# Altium PCB PCB-Powermodule-v7.0.3.PcbDoc (part 1 of 3)
Units mil, origin at the board's own origin, x right, y up, seen from the top; angles counter-clockwise.
Board outline 3937.01 x 1771.65 mil, 2 copper layers (Top Layer, Bottom Layer), stack 61.811 mil thick; 138 components, 96 nets, 573 pads, 259 vias.
Unrouted connection lines stored in the file: 20.
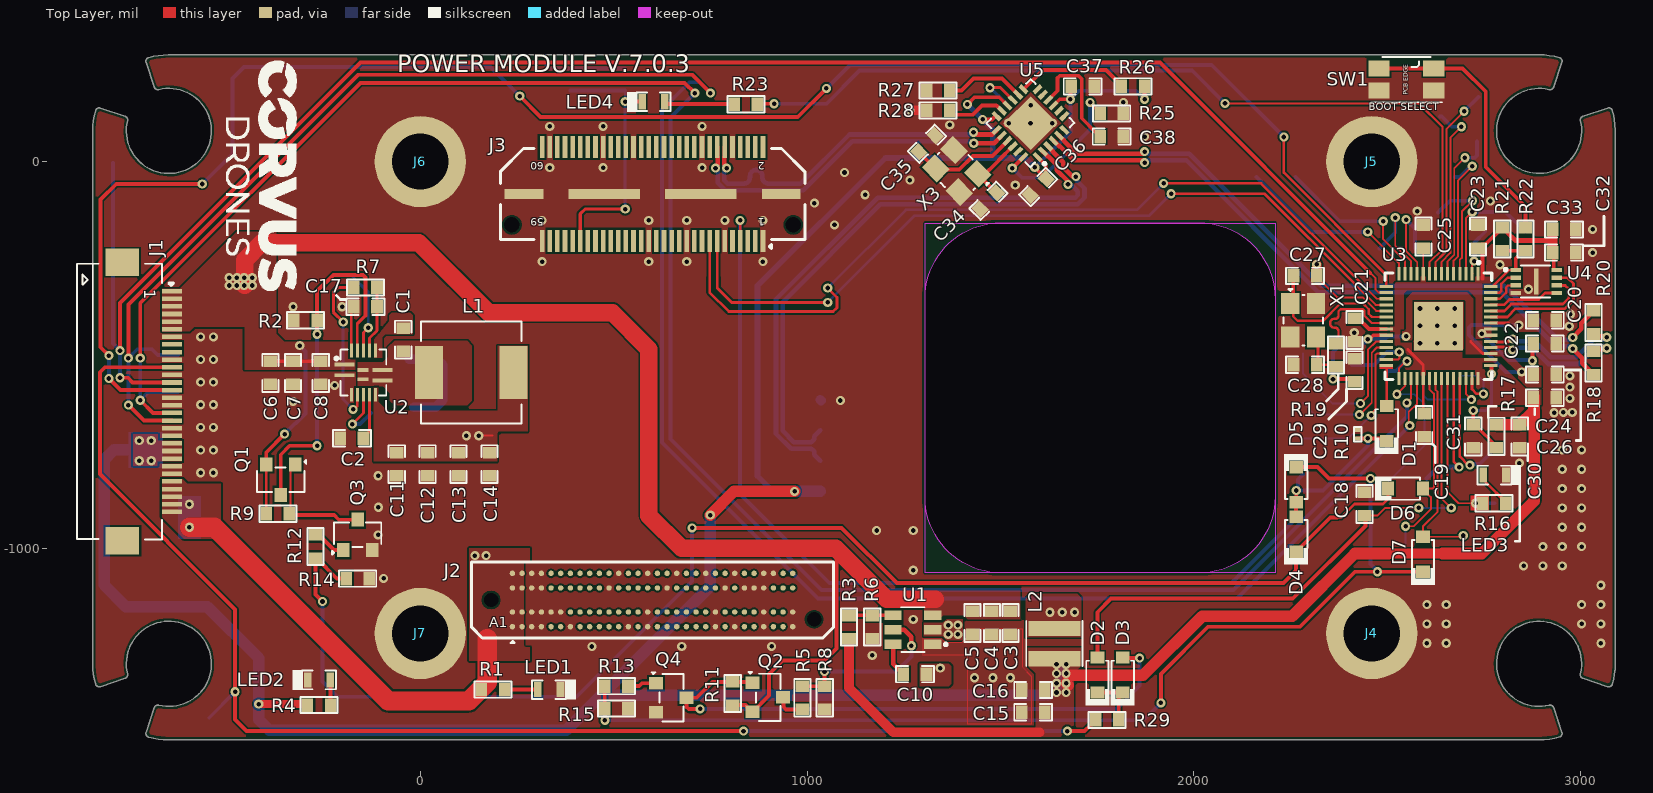
[diagram p0: Top Layer view]
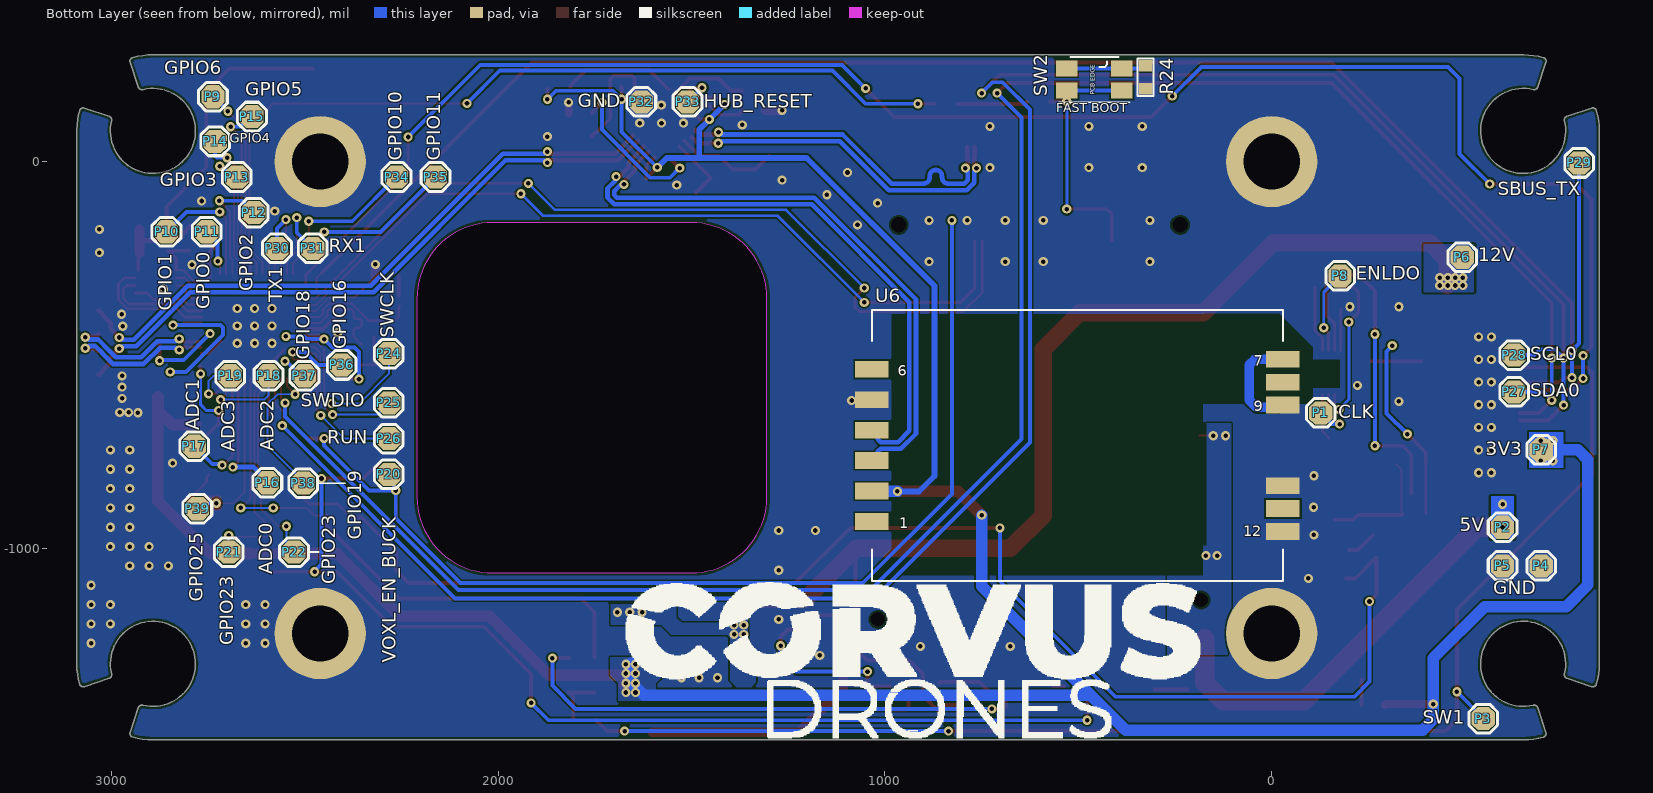
[diagram p1: Bottom Layer view, seen from below]
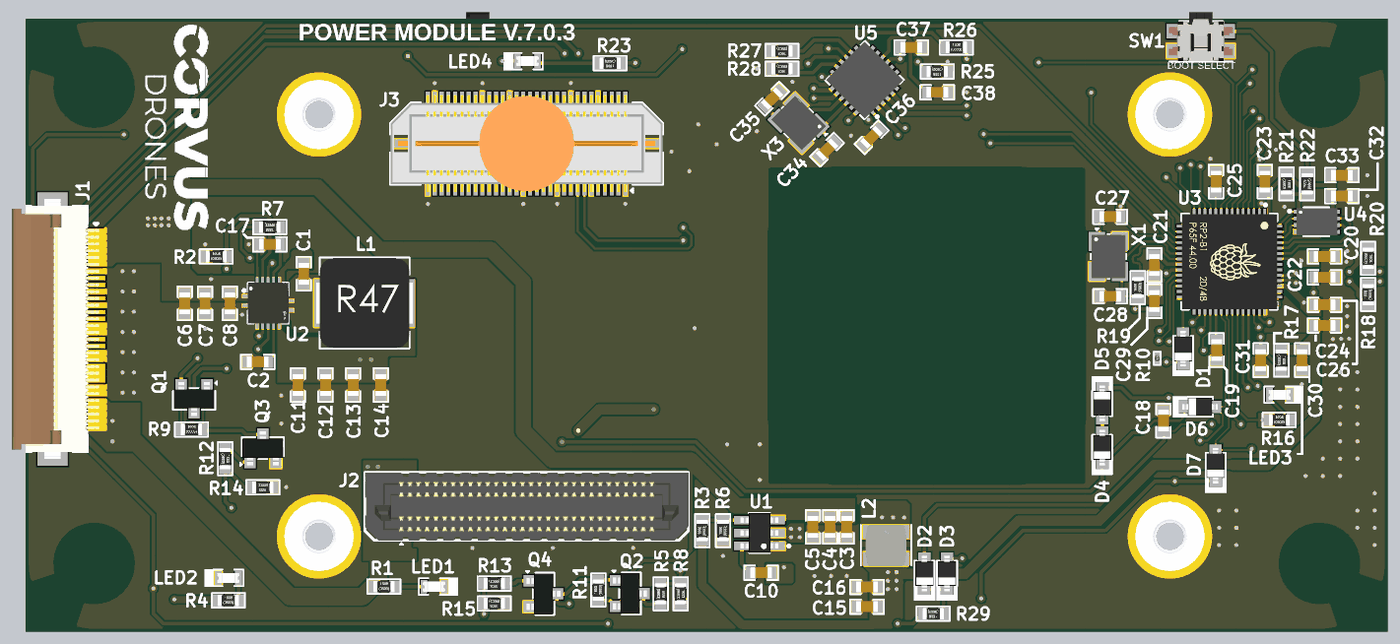
[diagram p3: 3D render of the assembled board from above, using the file's embedded part models]
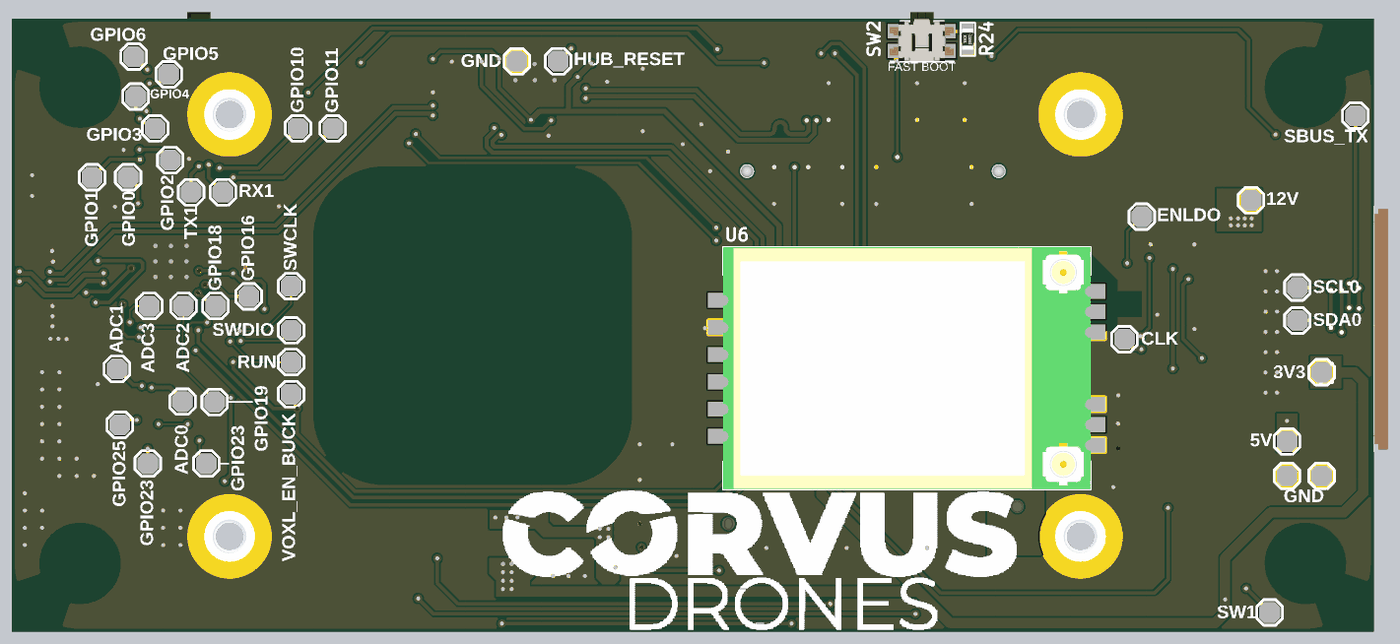
[diagram p4: 3D render of the assembled board from below, using the file's embedded part models]

## Layer stack, top to bottom
Top Solder: solder mask 0.3937, Solder Resist, Dk 3.5
Top Layer: signal copper 1.378
Dielectric 1: dielectric 59.0551, FR-4, Dk 4.8
Bottom Layer: signal copper 1.378
Bottom Solder: solder mask 0.3937, Solder Resist, Dk 3.5

## Board outline
-827.53,-1357.78 cw(c-830.64,-1348.44) -840.13,-1351.05 cw(c-650.38,-1298.77) -847.2,-1298.76 -847.2,79.19 cw(c-650.34,79.21) -840.13,131.49 cw(c-830.64,128.87) -827.53,138.21 -763.66,116.94 cw(c-766.78,107.61) -757.22,105.27 ccw(c-650.35,79.19) -549.41,35.46 -545.98,44.43 ccw(c-650.34,79.19) -676.42,186.06 cw(c-678.76,195.63) -688.1,192.51 -709.37,256.37 cw(c-700.03,259.48) -702.64,268.97 cw(c-650.33,79.2) -652.14,276.04 2892.96,276.04 cw(c2892.96,79.21) 2945.67,268.85 cw(c2942.63,259.48) 2951.96,256.32 2930.7,192.49 cw(c2921.37,195.61) 2919.28,186 2918.49,186.19 ccw(c2892.95,79.19) 2858.19,-25.17 2867.42,-27.8 ccw(c2892.96,79.19) 2999.82,105.29 cw(c3009.38,107.6) 3006.27,116.94 3070.13,138.21 cw(c3073.25,128.87) 3082.79,131.29 cw(c2892.94,79.2) 3089.06,96.32 3089.81,79.19 3089.81,-1298.76 cw(c2892.96,-1298.74) 3082.5,-1351.89 3082.47,-1351.88 cw(c3073.24,-1348.44) 3070.13,-1357.78 3006.27,-1336.51 cw(c3009.39,-1327.17) 2999.82,-1324.83 ccw(c2892.96,-1298.75) 2792.02,-1255.03 2788.59,-1263.99 ccw(c2892.96,-1298.76) 2919.03,-1405.63 cw(c2921.37,-1415.19) 2930.71,-1412.07 2951.98,-1475.94 cw(c2942.64,-1479.05) 2946.82,-1487.96 2946.88,-1488.08 cw(c2892.95,-1298.76) 2892.96,-1495.61 -650.35,-1495.61 -652.14,-1495.6 cw(c-650.37,-1298.76) -702.64,-1488.54 cw(c-700.03,-1479.05) -709.37,-1475.94 -688.1,-1412.07 cw(c-678.76,-1415.19) -676.42,-1405.63 ccw(c-650.35,-1298.76) -545.98,-1263.99 -549.41,-1255.03 ccw(c-650.35,-1298.75) -757.22,-1324.83 cw(c-766.78,-1327.17) -763.66,-1336.51
cut-out: 1305.04,-866.89 1305.04,-354.78 cw(c1501.89,-354.78) 1501.89,-157.93 2013.71,-157.93 cw(c2013.71,-354.78) 2210.56,-354.78 2210.56,-866.89 cw(c2013.71,-866.89) 2013.71,-1063.74 1501.89,-1063.74 cw(c1501.89,-866.89)

## Design rules (kind name [scope] priority, off if disabled: settings)
BoardOutlineClearance [All] p1: gap=0 ignorepadtopadclearanceinfootprint=FALSE except(7.87: Poly-OutlineEdge Poly-CavityEdge Poly-CutoutEdge Poly-SplitBarrior)
Clearance [All] p1: gap=5 ignorepadtopadclearanceinfootprint=FALSE
DiffPairsRouting [All] p1: maxlimit=5 minlimit=5 mostfreqgap=5 toplayer_minwidth=8 toplayer_maxwidth=12 toplayer_prefwidth=8 bottomlayer_minwidth=8 bottomlayer_maxwidth=12 bottomlayer_prefwidth=8 maxuncoupledlength=500
HoleSize [All] p1: absolutevalues=TRUE maxlimit=1000 minlimit=1 maxpercent=80.000 minpercent=20.000
HoleToHoleClearance [All] p1: gap=6 allowstackedmicrovias=TRUE
MatchedLengths "Schematic Matched Net Lengths_3" [InNetClass('USB_D')] p1: tolerance=20 checknetsindiffpair=TRUE checkdiffpairvsdiffpair=FALSE checkxsignals=FALSE checkothers=FALSE
MatchedLengths "Schematic Matched Net Lengths_2" [InNetClass('VOXL_USB')] p2: tolerance=20 checknetsindiffpair=TRUE checkdiffpairvsdiffpair=FALSE checkxsignals=FALSE checkothers=FALSE
MatchedLengths "Schematic Matched Net Lengths_1" [InNetClass('USB-WIFI')] p3: tolerance=20 checknetsindiffpair=TRUE checkdiffpairvsdiffpair=FALSE checkxsignals=FALSE checkothers=FALSE
MatchedLengths "Schematic Matched Net Lengths" [InNetClass('D')] p4: tolerance=20 checknetsindiffpair=TRUE checkdiffpairvsdiffpair=FALSE checkxsignals=FALSE checkothers=FALSE
MaxMinImpedance "Schematic Impedance Constraint_3" [InNetClass('D')] p1: minimum=88.00 maximum=102.0
MaxMinImpedance "Schematic Impedance Constraint_2" [InNetClass('USB-WIFI')] p2: minimum=88.00 maximum=102.0
MaxMinImpedance "Schematic Impedance Constraint_1" [InNetClass('USB_D')] p3: minimum=88.00 maximum=102.0
MaxMinImpedance "Schematic Impedance Constraint" [InNetClass('VOXL_USB')] p4: minimum=88.00 maximum=102.0
MinimumSolderMaskSliver [All] p1: minsoldermaskwidth=0
PolygonConnect [All] p1: connectstyle=Direct reliefconductorwidth=10 reliefentries=4 polygonreliefangle="90 Angle" airgapwidth=10
RoutingVias [All] p1: holewidth=11.81 width=23.62 viastyle="Through Hole" minholewidth=11.81 minwidth=23.62 maxholewidth=11.81 maxwidth=23.62
SilkToSilkClearance [All] p1: silktosilkclearance=0
SilkToSolderMaskClearance [IsPad] p1: minsilkscreentomaskgap=0 clearancetoexposedcopper=TRUE
SolderMaskExpansion SolderMaskExpansion_1 [IsVia] p1: expansion=4 istentingtop=TRUE
SolderMaskExpansion [All] p2: expansion=4 istentingtop=FALSE
UnRoutedNet [All] p1: checkbadconnections=TRUE
Width [All] p1: maxlimit=100 minlimit=5 preferedwidth=5
23 further rules are at their usual default settings.

## Classes and differential pairs
differential pair class VOXL_USB_Lines: VOXL_USB
differential pair class USB_WIFI_Lines: USB-WIFI
differential pair class USB_D_Lines: USB_D
differential pair class D_Lines: D
net class VOXL_USB: VOXL_USB_N VOXL_USB_P
net class USB_D: USB_D_N USB_D_P
net class USB-WIFI: USB-WIFI_N USB-WIFI_P
net class D: D_N D_P
component class U_WiFiModule_Section: C34 C35 C36 C37 C38 P30 P31 P32 P33 R25 R26 R27 R28 U5 U6 X3
component class U_Power_Section: C1 C2 C3 C4 C5 C6 C7 C8 C10 C11 C12 C13 C14 C15 C16 C17 C18 D1 D2 D3 D4 D5 D6 D7 L1 L2 LED1 LED2 P1 P2 P3 P4 P5 P6 P7 P8 P20 P21 P22 Q1 Q2 Q3 Q4 R1 R2 R3 R4 R5 R6 R7 R8 R9 R10 R11 R12 R13 R14 R15 R29 U1 U2
component class U_FlashMemory_Section: C32 C33 R21 R22 SW1 U4
component class U_Controller_Section: C19 C20 C21 C22 C23 C24 C25 C26 C27 C28 C29 C30 C31 LED3 P9 P10 P11 P12 P13 P14 P15 P16 P17 P18 P19 P24 P25 P26 P34 P35 P36 P37 P38 P39 R16 R17 R18 R19 R20 U3 X1
component class U_Connector_Section: J1 J2 J3 J4 J5 J6 J7 LED4 P27 P28 P29 R23 R24 SW2
differential pair VOXL_USB: +VOXL_USB_P -VOXL_USB_N
differential pair USB_D: +USB_D_P -USB_D_N
differential pair USB-WIFI: +USB-WIFI_P -USB-WIFI_N
differential pair D: +D_P -D_N

## Components (designator, comment, footprint, x,y, rotation, side; value= is the part's Value field where it differs from the comment)
C1 "0.1uF" CAP-0603 -44.2,-460.61 r90 top locked
C2 "4.7UF" CAP-0603 -177.2,-715.61 r0 top locked
C3 "10uF" CAP-0603 1526,-1193 r90 top locked
C4 "10uF" CAP-0603 1478,-1193 r90 top locked
C5 "0.1uF" CAP-0603 1428,-1193 r90 top locked
C6 "10uF" CAP-0603 -388,-546.4 r90 top locked
C7 "10uF" CAP-0603 -329.44,-546.4 r90 top locked
C8 "0.1uF" CAP-0603 -257.71,-546.4 r90 top locked
C10 "0.1uF" CAP-0603 1278.8,-1325.61 r180 top locked
C11 "22uF" CAP-0603 -61.2,-782.61 r90 top locked
C12 "22uF" CAP-0603 18.8,-782.61 r90 top locked
C13 "22uF" CAP-0603 98.8,-782.61 r90 top locked
C14 "22uF" CAP-0603 178.8,-782.61 r90 top locked
C15 "22uF" CAP-0603 1584.8,-1424 r0 top locked
C16 "22uF" CAP-0603 1584.8,-1366.61 r0 top
C17 "2.2uF" CAP-0603 -142.2,-375.61 r0 top locked
C18 "0.1uF" CAP-0603 2441.8,-885.61 r270 top locked
C19 "0.1uF" CAP-0603 2595.8,-681.61 r270 top locked
C20 "0.1uF" CAP-0603 2907.8,-410.61 r180 top locked
C21 "0.1uF" CAP-0603 2415.8,-435.61 r270 top
C22 "0.1uF" CAP-0603 2907.8,-470.61 r180 top locked
C23 "0.1uF" CAP-0603 2735,-194 r270 top locked
C24 "0.1uF" CAP-0603 2907.8,-610.61 r0 top locked
C25 "0.1uF" CAP-0603 2594,-194 r270 top locked
C26 "0.1uF" CAP-0603 2907.8,-550.61 r180 top locked
C27 "10pF" CAP-0603 2287.8,-295.61 r0 top locked
C28 "10pF" CAP-0603 2287.8,-525.61 r180 top locked
C29 "2.2uF" CAP-0603 2415.8,-539.61 r270 top
C30 "2.2uF" CAP-0603 2842.8,-710.61 r90 top locked
C31 "2.2uF" CAP-0603 2722.8,-710.61 r90 top locked
C32 "2.2uF" CAP-0603 2957.8,-235.61 r180 top locked
C33 "0.1uF" CAP-0603 2957.8,-175.61 r180 top locked
C34 "10pF" CAP-0603 1468.8,-101.61 r45 top
C35 "10pF" CAP-0603 1310.06,46.17 r45 top
C36 "0.1uF" CAP-0603 1597.8,-65.61 r45 top locked
C37 "1uF" CAP-0603 1712.8,194.39 r180 top locked
C38 "1uF" CAP-0603 1787.8,64.39 r180 top locked
D1 "DNP" SOD-323 2498.8,-677.61 r90 top
D2 "1N4148WS" SOD-323 1751,-1327.96 r90 top locked
D3 "1N4148WS" SOD-323 1816,-1327.96 r90 top locked
D4 "1N4148WS" SOD-323 2264.8,-963.61 r90 top locked
D5 "1N4148WS" SOD-323 2264.8,-835.61 r270 top locked
D6 "1N4148WS" SOD-323 2547.8,-845.61 r0 top locked
D7 "1N4148WS" SOD-323 2592.8,-1015.61 r90 top locked
J1 "FH12-30S-0.5SH(55)" FH12-30S-0.5SH(55) -706.5,-620.59 r270 top locked
J2 "ADM6-30-01.5-L-4-2-A-TR" ADM6-30-01.5-L-4-2-A-TR 600.41,-1133.86 r180 top locked
J3 "QTH-030-01-L-D-A-K-TR" QTH-030-01-L-D-A-K-TR 600.4,-83.86 r180 top
J4 "9774050151R" SPACER 2460.63,-1220.47 r0 top
J5 "9774050151R" SPACER 2460.63,0 r0 top
J6 "9774050151R" SPACER 0,0 r0 top
J7 "9774050151R" SPACER 0,-1220.47 r0 top
L1 "1.5uH" HA72L-06301R5LFTR 131.81,-545.59 r0 top locked
L2 "3.3uH" VLS3012HBX-3R3M 1639.8,-1246.61 r270 top locked
LED1 "Emerald" LED-0603 332.8,-1365.61 r0 top locked
LED2 "Emerald" LED-0603 -262.2,-1340.61 r180 top locked
LED3 "Emerald" LED-0603 2777.8,-810.61 r0 top locked
LED4 "RED" LED-0603 602.8,154.39 r180 top locked
P1 "TEST POINT" TEST-POINT -127,-650 r180 bottom locked
P2 "TEST POINT" TEST-POINT -597.2,-945.61 r180 bottom locked
P3 "TEST POINT" TEST-POINT -547.2,-1440.61 r180 bottom locked
P4 "TEST POINT" TEST-POINT -697.2,-1045.61 r180 bottom locked
P5 "TEST POINT" TEST-POINT -597.2,-1045.61 r180 bottom locked
P6 "TEST POINT" TEST-POINT -493.2,-247.61 r180 bottom locked
P7 "TEST POINT" TEST-POINT -697.2,-745.61 r180 bottom locked
P8 "TEST POINT" TEST-POINT -177.2,-295.61 r180 bottom locked
P9 "TEST POINT" TEST-POINT 2737.8,167.39 r180 bottom locked
P10 "TEST POINT" TEST-POINT 2857.8,-181.61 r180 bottom locked
P11 "TEST POINT" TEST-POINT 2753.8,-181.61 r180 bottom locked
P12 "TEST POINT" TEST-POINT 2632,-132 r180 bottom locked
P13 "TEST POINT" TEST-POINT 2676,-40 r180 bottom locked
P14 "TEST POINT" TEST-POINT 2732,52 r180 bottom
P15 "TEST POINT" TEST-POINT 2636.8,116.39 r180 bottom locked
P16 "TEST POINT" TEST-POINT 2596.8,-830.61 r180 bottom
P17 "TEST POINT" TEST-POINT 2786,-736 r180 bottom locked
P18 "TEST POINT" TEST-POINT 2594,-554 r180 bottom locked
P19 "TEST POINT" TEST-POINT 2693,-554 r180 bottom locked
P20 "TEST POINT" Test-point 2282.8,-809 r180 bottom
P21 "TEST POINT" Test-point 2697,-1010 r180 bottom
P22 "TEST POINT" Test-point 2528,-1010 r180 bottom
P24 "TEST POINT" TEST-POINT 2282.8,-496.61 r180 bottom
P25 "TEST POINT" TEST-POINT 2282.8,-624.07 r180 bottom
P26 "TEST POINT" TEST-POINT 2282.8,-716.54 r180 bottom
P27 "TEST POINT" TEST-POINT -627.2,-595.61 r270 bottom locked
P28 "TEST POINT" TEST-POINT -627.2,-500.61 r270 bottom locked
P29 "TEST POINT" TEST-POINT -795.2,-3.61 r270 bottom locked
P30 "TEST POINT" TEST-POINT 2572,-224.61 r180 bottom
P31 "TEST POINT" TEST-POINT 2479.84,-224.61 r180 bottom
P32 "TEST POINT" TEST-POINT 1629.6,154.31 r180 bottom
P33 "TEST POINT" TEST-POINT 1510.39,154.31 r180 bottom
P34 "TEST POINT" TEST-POINT 2263,-40 r180 bottom
P35 "TEST POINT" TEST-POINT 2162.02,-40 r180 bottom
P36 "TEST POINT" TEST-POINT 2405,-526 r180 bottom locked
P37 "TEST POINT" TEST-POINT 2501,-554 r180 bottom locked
P38 "TEST POINT" TEST-POINT 2503.8,-831.61 r180 bottom
P39 "TEST POINT" TEST-POINT 2777.8,-897.61 r180 bottom
Q1 "SI2301CDS" SOT-23 -361.2,-822.61 r180 top locked
Q2 "SI2301CDS" SOT-23 898.8,-1385.61 r270 top locked
Q3 "2N7002,215" SOT-23 -162.2,-965.61 r0 top
Q4 "2N7002,215" SOT-23 648.8,-1386.61 r270 top
R1 "200R" RES-0603 187.8,-1365.61 r180 top locked
R2 "100K" RES-0603 -297.2,-410.61 r180 top locked
R3 "33.2K" RES-0603 1108.39,-1203.8 r270 top locked
R4 "200R" RES-0603 -262.2,-1405.61 r180 top locked
R5 "10K" RES-0603 987.8,-1386.61 r90 top locked value=10kR
R6 "10K" RES-0603 1168.39,-1203.8 r270 top locked value=10kR
R7 "100K" RES-0603 -142.2,-325.61 r0 top locked
R8 "100K" RES-0603 1045.8,-1386.61 r90 top locked
R9 "1M" RES-0603 -368.6,-911 r180 top locked
R10 "DNP" RES-0201 2423.84,-705.06 r270 top locked
R11 "1M" RES-0603 807.8,-1375.61 r270 top locked
R12 "4.7K" RES-0603 -271.2,-995.61 r90 top locked
R13 "4.7K" RES-0603 506.8,-1356.61 r0 top locked
R14 "100K" RES-0603 -162.2,-1078.61 r0 top locked
R15 "100K" RES-0603 506.8,-1414.61 r0 top locked
R16 "200R" RES-0603 2776.8,-883.61 r180 top locked
R17 "200R" RES-0603 2782.8,-710.61 r90 top locked
R18 "27R" RES-0603 3034,-521 r270 top locked
R19 "1K" RES-0603 2367.8,-500.61 r270 top
R20 "27R" RES-0603 3034,-416 r90 top locked
R21 "10K" RES-0603 2797.8,-200.61 r90 top locked value=10kR
R22 "1K" RES-0603 2857.8,-200.61 r270 top locked
R23 "200R" RES-0603 841.81,148.39 r0 top locked
R24 "DNP" RES-0603 326,218 r270 bottom locked
R25 "12K" RES-0603 1787.8,124.39 r0 top locked
R26 "50K" RES-0603 1842.8,194.39 r180 top locked value=50kR
R27 "50K" RES-0603 1338.88,183.74 r0 top value=50kR
R28 "50K" RES-0603 1338.78,132.43 r0 top value=50kR
R29 "1K" RES-0603 1776,-1444 r0 top
SW1 "EVQ-P7J01P" EVQ-P7J01P 2549.8,212.4 r180 top
SW2 "DNP" EVQ-P7J01P 458.8,212.4 r0 bottom
U1 "TPS563201DDCR" "SOT-23-6 THIN" 1273.8,-1210.61 r180 top locked
U2 "RT7291AGQUF" "QFN-16(3X3) RT7291AGQUF" -147.2,-545.59 r270 top locked
U3 "RP2040TR7" "QFN-56 (7X7)" 2632.8,-425.61 r270 top locked
U4 "W25Q16JVUXIQ TR" "8-USON (2X3)" 2832.62,-280.63 r0 top locked
U5 "USB2422/MJ" "24-QFN (4X4)" 1577.8,99.39 r135 top locked
U6 "BL-R8812AF1" BL-R8812AF1 502.35,-734 r180 bottom locked
X1 "12MHz" MCSJK-7U-12.00-10-10-80-B-10 2282.8,-410.61 r270 top
X3 "24MHz" MCSJK-7U-24.00-12-10-60-B-10 1386.8,-24.61 r135 top

## Footprints (in the part's own frame and the unit in brackets; to place one, negate y for a bottom-side part, rotate by r counter-clockwise, add the part's x,y. Pads: shape width x height; smd on the part's side, far side on the other; paste and mask are expansions set on the pad)
"8-USON (2X3)" [mm]
  rect 0.711x0.28 smd: 1(0,0) 2(0,-0.5) 3(0,-1) 4(0,-1.5) 5(2.695,-1.5) 6(2.695,-1) 7(2.695,-0.5) 8(2.695,0)
  rect 0.3x1.7 smd: 9(1.348,-0.75)
  silkscreen extent -0.72,-1.8 2.26,0.3, body extent -0.15,-1.75 2.85,0.25, height 0.6
"24-QFN (4X4)" [mm]
  rect 0.69x0.28 smd: 1(-1.895,1.25) 2(-1.895,0.75) 3(-1.895,0.25) 4(-1.895,-0.25) 5(-1.895,-0.75) 6(-1.895,-1.25) 13(1.895,-1.25) 14(1.895,-0.75) 15(1.895,-0.25) 16(1.895,0.25) 17(1.895,0.75) 18(1.895,1.25)
  rect 0.28x0.69 smd: 7(-1.25,-1.895) 8(-0.75,-1.895) 9(-0.25,-1.895) 10(0.25,-1.895) 11(0.75,-1.895) 12(1.25,-1.895) 19(1.25,1.895) 20(0.75,1.895) 21(0.25,1.895) 22(-0.25,1.895) 23(-0.75,1.895) 24(-1.25,1.895)
  rect 2.5x2.5 smd: 25(0,0)
  silkscreen extent -2.6,-2.06 2.04,2.06, body extent -2,-2 2,2, height 0.8
ADM6-30-01.5-L-4-2-A-TR [mm]
  round 0.356 smd: A01(9.207,1.75) A02(8.572,1.75) A03(7.938,1.75) A04(7.302,1.75) A05(6.667,1.75) A06(6.032,1.75) A07(5.397,1.75) A08(4.763,1.75) A09(4.127,1.75) A10(3.492,1.75) A11(2.857,1.75) A12(2.222,1.75) A13(1.587,1.75) A14(0.952,1.75) A15(0.317,1.75) A16(-0.318,1.75) A17(-0.953,1.75) A18(-1.588,1.75) A19(-2.223,1.75) A20(-2.858,1.75) A21(-3.492,1.75) A22(-4.127,1.75) A23(-4.763,1.75) A24(-5.397,1.75) A25(-6.032,1.75) A26(-6.667,1.75) A27(-7.302,1.75) A28(-7.938,1.75) A29(-8.572,1.75) A30(-9.207,1.75) B01(9.207,0.79) B02(8.572,0.79) B03(7.938,0.79) B04(7.302,0.79) B05(6.667,0.79) B06(6.032,0.79) B07(5.397,0.79) B08(4.763,0.79) B09(4.127,0.79) B10(3.492,0.79) B11(2.857,0.79) B12(2.222,0.79) B13(1.587,0.79) B14(0.952,0.79) B15(0.317,0.79) B16(-0.318,0.79) B17(-0.953,0.79) B18(-1.588,0.79) B19(-2.222,0.79) B20(-2.857,0.79) B21(-3.492,0.79) B22(-4.127,0.79) B23(-4.763,0.79) B24(-5.397,0.79) B25(-6.032,0.79) B26(-6.667,0.79) B27(-7.302,0.79) B28(-7.938,0.79) B29(-8.572,0.79) B30(-9.207,0.79) C01(9.207,-0.79) C02(8.572,-0.79) C03(7.938,-0.79) C04(7.302,-0.79) C05(6.667,-0.79) C06(6.032,-0.79) C07(5.397,-0.79) C08(4.763,-0.79) C09(4.127,-0.79) C10(3.492,-0.79) C11(2.857,-0.79) C12(2.222,-0.79) C13(1.588,-0.79) C14(0.953,-0.79) C15(0.318,-0.79) C16(-0.317,-0.79) C17(-0.952,-0.79) C18(-1.587,-0.79) C19(-2.222,-0.79) C20(-2.857,-0.79) C21(-3.492,-0.79) C22(-4.127,-0.79) C23(-4.763,-0.79) C24(-5.397,-0.79) C25(-6.032,-0.79) C26(-6.667,-0.79) C27(-7.302,-0.79) C28(-7.938,-0.79) C29(-8.572,-0.79) C30(-9.207,-0.79) D01(9.207,-1.75) D02(8.572,-1.75) D03(7.938,-1.75) D04(7.302,-1.75) D05(6.667,-1.75) D06(6.032,-1.75) D07(5.397,-1.75) D08(4.763,-1.75) D09(4.127,-1.75) D10(3.492,-1.75) D11(2.858,-1.75) D12(2.223,-1.75) D13(1.588,-1.75) D14(0.953,-1.75) D15(0.318,-1.75) D16(-0.317,-1.75) D17(-0.952,-1.75) D18(-1.587,-1.75) D19(-2.222,-1.75) D20(-2.857,-1.75) D21(-3.492,-1.75) D22(-4.127,-1.75) D23(-4.763,-1.75) D24(-5.397,-1.75) D25(-6.032,-1.75) D26(-6.667,-1.75) D27(-7.302,-1.75) D28(-7.938,-1.75) D29(-8.572,-1.75) D30(-9.207,-1.75)
  round 0 hole 0.95 unplated: ""(-10.61,1.27) ""(10.61,0)
  silkscreen extent -11.89,-2.5 11.89,2.82, body extent -11.89,-2.49 11.89,2.51, height 4.1
BL-R8812AF1 [mm]
  rect 2.2x1.1 smd: 1(-13.5,-5) 2(-13.5,-3) 3(-13.5,-1) 4(-13.5,1) 5(-13.5,3) 6(-13.5,5) 7(13.5,5.65) 8(13.5,4.15) 9(13.5,2.65) 10(13.5,-2.65) 11(13.5,-4.15) 12(13.5,-5.65)
  silkscreen extent -13.5,-8.9 13.5,8.9, body extent -13.5,-8.91 13.5,8.89, height 2.09
CAP-0603 [mil]
  rect 30x35 smd mask+2.36: 1(-30,0) 2(30,0)
  silkscreen extent -49,-21 49,21, body extent -32,-16 31,16, height 34
EVQ-P7J01P [mm]
  rect 1.4x1.05 smd: 1(-1.8,0.725) 1(1.8,0.725) 2(-1.8,-0.725) 2(1.8,-0.725)
  silkscreen extent -2.34,-1.47 2.31,1.5, body extent -2.35,-2.1 2.35,1.45, height 1.35
FH12-30S-0.5SH(55) [mm]
  rect 0.3x1.3 smd paste-2: 1(-7.25,1.625) 2(-6.75,1.625) 3(-6.25,1.625) 4(-5.75,1.625) 5(-5.25,1.625) 6(-4.75,1.625) 7(-4.25,1.625) 8(-3.75,1.625) 9(-3.25,1.625) 10(-2.75,1.625) 11(-2.25,1.625) 12(-1.75,1.625) 13(-1.25,1.625) 14(-0.75,1.625) 15(-0.25,1.625) 16(0.25,1.625) 17(0.75,1.625) 18(1.25,1.625) 19(1.75,1.625) 20(2.25,1.625) 21(2.75,1.625) 22(3.25,1.625) 23(3.75,1.625) 24(4.25,1.625) 25(4.75,1.625) 26(5.25,1.625) 27(5.75,1.625) 28(6.25,1.625) 29(6.75,1.625) 30(7.25,1.625)
  rect 1.8x2.2 smd: MP1(-9.15,-1.625) MP2(9.15,-1.625)
  silkscreen extent -9.05,-4.62 9.05,1.73, body extent -9.55,-4.62 9.55,1.78, height 2.09
HA72L-06301R5LFTR [mm]
  rect 1.85x3.5 smd: 1(-2.775,0) 2(2.775,0)
  silkscreen extent -3.3,-3.35 3.3,3.35, body extent -3.55,-3.3 3.55,3.3, height 3.01
LED-0603 [mm]
  rect 0.5x1 smd: 1(-0.75,0) 2(0.75,0)
  silkscreen extent -1.12,-0.66 1.75,0.66, body extent -0.82,-0.37 0.82,0.36, height 0.68
MCSJK-7U-12.00-10-10-80-B-10 [mm]
  rect 1.4x1.2 smd mask+0.07: 1(-1.1,-0.85) 2(1.1,-0.85) 3(1.1,0.85) 4(-1.1,0.85)
  silkscreen extent -2.06,-1.3 1.65,1.3, body extent -1.6,-1.25 1.6,1.25, height 0.91
MCSJK-7U-24.00-12-10-60-B-10 [mm]
  rect 1.4x1.2 smd mask+0.07: 1(-1.1,-0.85) 2(1.1,-0.85) 3(1.1,0.85) 4(-1.1,0.85)
  silkscreen extent -2.06,-1.3 1.65,1.3, body extent -1.6,-1.25 1.6,1.25, height 0.91
"QFN-16(3X3) RT7291AGQUF" [mm]
  rect 0.25x1.3 smd paste+0 mask+0.051: 1(-0.52,-1.25) 2(0.18,-1.25) 8(0.53,1.25) 9(-0.17,1.25)
  rect 0.9x0.2 smd paste+0 mask+0.051: 3(1.45,-0.8) 4(1.45,-0.4) 5(1.45,0) 6(1.45,0.4) 7(1.45,0.8) 10(-1.45,0.8) 11(-1.45,0.4) 12(-1.45,0) 13(-1.45,-0.4) 14(-1.45,-0.8)
  rect 0.25x0.7 smd paste+0 mask+0.051: 15(-0.16,-0.025) 16(0.44,-0.025)
  silkscreen extent -1.5,-1.83 1.5,1.5, body extent -1.51,-1.51 1.51,1.51, height 0.53
"QFN-56 (7X7)" [mm]
  rect 0.875x0.2 smd: 1(-3.438,2.6) 2(-3.438,2.2) 3(-3.438,1.8) 4(-3.438,1.4) 5(-3.438,1) 6(-3.438,0.6) 7(-3.438,0.2) 8(-3.438,-0.2) 9(-3.438,-0.6) 10(-3.438,-1) 11(-3.438,-1.4) 12(-3.438,-1.8) 13(-3.438,-2.2) 14(-3.438,-2.6) 29(3.438,-2.6) 30(3.438,-2.2) 31(3.438,-1.8) 32(3.438,-1.4) 33(3.438,-1) 34(3.438,-0.6) 35(3.438,-0.2) 36(3.438,0.2) 37(3.438,0.6) 38(3.438,1) 39(3.438,1.4) 40(3.438,1.8) 41(3.438,2.2) 42(3.438,2.6)
  rect 0.2x0.875 smd: 15(-2.6,-3.438) 16(-2.2,-3.438) 17(-1.8,-3.438) 18(-1.4,-3.438) 19(-1,-3.438) 20(-0.6,-3.438) 21(-0.2,-3.438) 22(0.2,-3.438) 23(0.6,-3.438) 24(1,-3.438) 25(1.4,-3.438) 26(1.8,-3.438) 27(2.2,-3.438) 28(2.6,-3.438) 43(2.6,3.438) 44(2.2,3.438) 45(1.8,3.438) 46(1.4,3.438) 47(1,3.438) 48(0.6,3.438) 49(0.2,3.438) 50(-0.2,3.438) 51(-0.6,3.438) 52(-1,3.438) 53(-1.4,3.438) 54(-1.8,3.438) 55(-2.2,3.438) 56(-2.6,3.438)
  rect 3.2x3.2 smd: 57(0,0)
  silkscreen extent -4.22,-3.5 3.5,3.5, body extent -3.5,-3.5 3.5,3.5, height 0.9
QTH-030-01-L-D-A-K-TR [mm]
  rect 0.305x1.45 smd: 01(-7.25,3.086) 02(-7.25,-3.086) 03(-6.75,3.086) 04(-6.75,-3.086) 05(-6.25,3.086) 06(-6.25,-3.086) 07(-5.75,3.086) 08(-5.75,-3.086) 09(-5.25,3.086) 10(-5.25,-3.086) 11(-4.75,3.086) 12(-4.75,-3.086) 13(-4.25,3.086) 14(-4.25,-3.086) 15(-3.75,3.086) 16(-3.75,-3.086) 17(-3.25,3.086) 18(-3.25,-3.086) 19(-2.75,3.086) 20(-2.75,-3.086) 21(-2.25,3.086) 22(-2.25,-3.086) 23(-1.75,3.086) 24(-1.75,-3.086) 25(-1.25,3.086) 26(-1.25,-3.086) 27(-0.75,3.086) 28(-0.75,-3.086) 29(-0.25,3.086) 30(-0.25,-3.086) 31(0.25,3.086) 32(0.25,-3.086) 33(0.75,3.086) 34(0.75,-3.086) 35(1.25,3.086) 36(1.25,-3.086) 37(1.75,3.086) 38(1.75,-3.086) 39(2.25,3.086) 40(2.25,-3.086) 41(2.75,3.086) 42(2.75,-3.086) 43(3.25,3.086) 44(3.25,-3.086) 45(3.75,3.086) 46(3.75,-3.086) 47(4.25,3.086) 48(4.25,-3.086) 49(4.75,3.086) 50(4.75,-3.086) 51(5.25,3.086) 52(5.25,-3.086) 53(5.75,3.086) 54(5.75,-3.086) 55(6.25,3.086) 56(6.25,-3.086) 57(6.75,3.086) 58(6.75,-3.086) 59(7.25,3.086) 60(7.25,-3.086)
  rect 2.54x0.64 smd: G1(-8.445,0) G4(8.445,0)
  rect 4.7x0.64 smd: G2(-3.175,0) G3(3.175,0)
  round 0 hole 1.02 unplated: ""(-9.24,2.03) ""(9.24,2.03)
  silkscreen extent -10,-2.99 10,3.58, body extent -10,-3.56 10,3.56, height 4.37
RES-0201 [mm]
  rect 0.27x0.37 smd mask+0.055: 1(-0.275,0) 2(0.275,0)
  silkscreen extent -0.48,-0.25 0.48,0.25, body extent -0.3,-0.15 0.3,0.15, height 0.29
RES-0603 [mil]
  rect 30x35 smd: 1(-30,0) 2(30,0)
  silkscreen extent -48,-21 48,21, body extent -31,-17 31,17, height 18
SOD-323 [mm]
  rect 0.8x0.9 smd mask+0.055: 1(-1.15,0) 2(1.15,0)
  silkscreen extent -2.01,-0.79 0.94,0.79, body extent -1.3,-0.67 1.3,0.67, height 1.1
SOT-23 [mm] "TRANS NPN 40V 0.6A SOT23"
  rect 0.82x0.92 smd: 1(-0.95,-1) 2(0.95,-1) 3(0,1)
  silkscreen extent -1.68,-1.3 1.55,0.81, body extent -1.5,-1.25 1.5,1.25, height 1.05
"SOT-23-6 THIN" [mm]
  rect 1.12x0.62 smd: 1(-1.3,0.95) 2(-1.3,0) 3(-1.3,-0.95) 4(1.3,-0.95) 5(1.3,0) 6(1.3,0.95)
  silkscreen extent -2.22,-1.47 0.79,1.47, body extent -1.4,-1.45 1.4,1.45, height 1.44
SPACER [mm]
  round 6 hole 3.7: 1(0,0)
  body extent -2.55,-2.55 2.55,2.55, height 5.2
TEST-POINT [mil]
  oct 60x60 smd: 1(0,0)
  silkscreen extent -37,-37 37,37
Test-point [mil]
  oct 60x60 smd: 1(0,0)
  silkscreen extent -37,-37 37,37
VLS3012HBX-3R3M [mm]
  rect 1x3.4 smd: 1(-1,0) 2(1,0)
  silkscreen extent -1.5,-1.85 1.47,1.85, body extent -1.51,-1.51 1.51,1.51, height 1.32

## Part data
C1 C5 C8 C10 C18 C19 C20 C21 C22 C23 C24 C25 C26 C33 C36: library part CL10B104KB8NNNC, "CAP CER 0.1UF 50V X7R 0603", Capacitance=100nF, Case Code (Imperial)=0603, Case Code (Metric)=1608, Dielectric=X7R, LCSC Part Number=C1591, MANUFACTURER=Samsung, Max Operating Temperature=125°C, Min Operating Temperature=-55°C, Package Quantity=1, Supplier Part Number 1=1276-1000-1-ND, Tolerance=10%, Voltage=50V, Case/Package=0603, Category="Ceramic Capacitors", ComponentLink1Description=https://datasheet.ciiva.com/25803/cl10b104kb8nnnc-25803393.pdf?src-supplier=Digi-Key, ComponentLink1URL=https://datasheet.ciiva.com/25803/cl10b104kb8nnnc-25803393.pdf?src-supplier=Digi-Key, ComponentLink2Description=https://datasheet.ciiva.com/26838/getdatasheetpartid-89097-26838411.pdf?src-supplier=Verical, ComponentLink2URL=https://datasheet.ciiva.com/26838/getdatasheetpartid-89097-26838411.pdf?src-supplier=Verical, ComponentLink3Description=https://datasheet.ciiva.com/29198/456651-da-01-en-vs-kondensator-0605-29198839.pdf?src-supplier=Conrad, ComponentLink3URL=https://datasheet.ciiva.com/29198/456651-da-01-en-vs-kondensator-0605-29198839.pdf?src-supplier=Conrad, Construction=Flat, Contact Plating=Tin, Depth=0.8mm, Height=0.8mm, Lead Free="Lead Free", Length=1.6mm, Manufacturer Part Number=CL10B104KB8NNNC, Material=Ceramic, Mount="Surface Mount", Packaging="Tape and Reel", Pricing 1="1=0.10000, 10=0.03000, 50=0.01640, 100=0.01340, 500=0.00954, 1000=0.00750 (USD)", Radiation Hardening=No, RoHS=Yes, RoHS Compliant=Yes, Series=CL, Stock 1=3998791, Supplier 1=Digi-Key, Thickness=0.035inch, Voltage Rating=50V, Voltage Rating (DC)=50V, Width=0.031inch
C2: library part CL10A475KA8NQNC, "CAP CER 4.7UF 25V X5R 0603", Capacitance=4.7uF, Case Code (Imperial)=0603, Case Code (Metric)=1608, Dielectric=X5R, LCSC Part Number=C69335, MANUFACTURER=Samsung, Max Operating Temperature=85°C, Min Operating Temperature=-55°C, Package Quantity=1, Supplier Part Number 1=1276-1900-1-ND, Tolerance=10%, Voltage Rating=25V, Case/Package=0603, ComponentLink1Description=http://www.samsungsem.com/kr/support/product-search/mlcc/CL10A475KA8NQNC.jsp?src-supplier=Digi-Key, ComponentLink1URL=http://www.samsungsem.com/kr/support/product-search/mlcc/CL10A475KA8NQNC.jsp?src-supplier=Digi-Key, Contact Plating=Tin, Depth=0.8mm, Lead Free="Lead Free", Length=1.6mm, Manufacturer Part Number=CL10A475KA8NQNC, Mount="Surface Mount", Packaging="Tape and Reel", Pricing 1="1=0.37, 10=0.255, 100=0.1528, 500=0.11456, 1000=0.09675 (USD)", Stock 1=2252340, Supplier 1=Digi-Key, Termination=Wraparound, Thickness=0.035inch, Width=0.031inch
C3 C4 C6 C7: library part GRM188R61E106KA73D, "CAP CER 10UF 25V X5R 0603", Case/Package=0603, LCSC Part Number=C344022, MANUFACTURER=Murata, Supplier Part Number 1=81-GRM188R61E106KA3D, Category="Ceramic Capacitors", ComponentLink1Description=https://search.murata.co.jp/Ceramy/image/img/A01X/G101/ENG/GRM188R61E106KA73-01.pdf?src-supplier=Digi-Key, ComponentLink1URL=https://search.murata.co.jp/Ceramy/image/img/A01X/G101/ENG/GRM188R61E106KA73-01.pdf?src-supplier=Digi-Key, Manufacturer Part Number=GRM188R61E106KA73D, Pricing 1="1=0.36000, 10=0.25800, 50=0.25800, 100=0.15500, 1000=0.09800, 10000=0.06900 (USD)", RoHS=Yes, RoHS Compliant=Yes, Stock 1=319428, Supplier 1=Mouser
C11 C12 C13 C14 C15 C16: library part CC0603MRX5R6BB226, "CAP CER 22UF 10V X5R 0603", Case Code (Imperial)=0603, Case Code (Metric)=1608, Dielectric=X5R, LCSC Part Number=C109447, MANUFACTURER=Yageo, Max Operating Temperature=85°C, Min Operating Temperature=-55°C, Package Quantity=4000, Supplier Part Number 1=311-1819-1-ND, Tolerance=20%, Voltage Rating=10V, Capacitance=22uF, Case/Package=0603, Category="Ceramic Capacitors", ComponentLink1Description=http://www.mouser.com/ds/2/447/Yageo_UPY-GP_NP0_16V-to-50V_9-358835.pdf?src-supplier=Mouser, ComponentLink1URL=http://www.mouser.com/ds/2/447/Yageo_UPY-GP_NP0_16V-to-50V_9-358835.pdf?src-supplier=Mouser, ComponentLink2Description=http://www.yageo.com/documents/recent/UPY-GPHC_X5R_4V-to-50V_25.pdf?src-supplier=Digi-Key, ComponentLink2URL=http://www.yageo.com/documents/recent/UPY-GPHC_X5R_4V-to-50V_25.pdf?src-supplier=Digi-Key, Halogen Free="Halogen Free", Height=0.8mm, Item Type=Capacitor, Lead Free="Lead Free", Length=0.063inch, Manufacturer Part Number=CC0603MRX5R6BB226, Mount="Surface Mount", Packaging="Tape and Reel", Pricing 1="1=0.68000, 10=0.48000, 50=0.36300, 100=0.31610, 500=0.23416, 1000=0.19903 (USD)", RoHS=Yes, RoHS Compliant=Yes, Stock 1=19628, Supplier 1=Digi-Key, Termination=SMD/SMT, Thickness=0.035inch, Voltage Rating (DC)=10V, Weight=7.1E-05oz, Width=0.8mm
C17 C29 C30 C31 C32: library part CC0603KRX5R8BB225, "CAP CER 2.2UF 25V X5R 0603", Case Code (Imperial)=0603, Case Code (Metric)=1608, Dielectric=X5R, LCSC Part Number=C309478, MANUFACTURER=Yageo, Max Operating Temperature=85°C, Min Operating Temperature=-55°C, Package Quantity=4000, Resistor Type=Ceramic, Supplier Part Number 1=311-1786-1-ND, Tolerance=10%, Voltage Rating=25V, Capacitance=2.2uF, Case/Package=0603, ComponentLink1Description=https://www.verical.com/server-webapp/html/getDatasheet?partID=782757&src-supplier=Verical, ComponentLink1URL=https://www.verical.com/server-webapp/html/getDatasheet?partID=782757&src-supplier=Verical, Depth=0.8mm, Halogen Free="Halogen Free", Item Type=Capacitor, Lead Free="Lead Free", Length=1.6mm, Manufacturer Part Number=CC0603KRX5R8BB225, Mount="Surface Mount", Packaging="Tape and Reel", Pricing 1="1=0.4, 10=0.276, 50=0.1932, 100=0.1656, 500=0.1242, 1000=0.10488 (USD)", Radiation Hardening=No, RoHS Compliant=Yes, Stock 1=687936, Supplier 1=Digi-Key, Termination=SMD/SMT, Thickness=0.037inch, Voltage Rating (DC)=25V, Weight=7.1E-05oz, Width=0.031inch
C27 C28 C34 C35: library part CC0603JRNPO9BN100, "CAP CER 10PF 50V C0G/NPO 0603", Case Code (Imperial)=0603, Case Code (Metric)=1608, Dielectric=C0G, Insulation Resistance=100GR, LCSC Part Number=C106245, MANUFACTURER=Yageo, Max Operating Temperature=125°C, Min Operating Temperature=-55°C, Package Quantity=1, Resistor Type=Ceramic, Supplier Part Number 1=311-1058-1-ND, Temperature Coefficient=30ppm/°C, Tolerance=5%, Voltage=50V, Capacitance=10pF, Case/Package=0603, Category="Ceramic Capacitors", ComponentLink1Description=https://datasheet.ciiva.com/25787/cl10a475ka8nqnc-25787017.pdf?src-supplier=Digi-Key, ComponentLink1URL=https://datasheet.ciiva.com/25787/cl10a475ka8nqnc-25787017.pdf?src-supplier=Digi-Key, ComponentLink2Description=https://datasheet.ciiva.com/144/mlccorderingcode-144651.pdf?src-supplier=Digi-Key, ComponentLink2URL=https://datasheet.ciiva.com/144/mlccorderingcode-144651.pdf?src-supplier=Digi-Key, ComponentLink3Description=https://datasheet.ciiva.com/11786/0900766b8079c870-11786407.pdf?src-supplier=RSComponents, ComponentLink3URL=https://datasheet.ciiva.com/11786/0900766b8079c870-11786407.pdf?src-supplier=RSComponents, ComponentLink4Description=https://datasheet.ciiva.com/5789/1734582-5789616.pdf?src-supplier=Farnell, ComponentLink4URL=https://datasheet.ciiva.com/5789/1734582-5789616.pdf?src-supplier=Farnell, ComponentLink5Description=https://datasheet.ciiva.com/26862/getdatasheetpartid-403524-26862758.pdf?src-supplier=Verical, ComponentLink5URL=https://datasheet.ciiva.com/26862/getdatasheetpartid-403524-26862758.pdf?src-supplier=Verical, ComponentLink6Description=https://datasheet.ciiva.com/7978/1132289-7978126.pdf?src-supplier=Element14, ComponentLink6URL=https://datasheet.ciiva.com/7978/1132289-7978126.pdf?src-supplier=Element14, ComponentLink7Description=https://datasheet.ciiva.com/46430/1835847-46430150.pdf?src-supplier=Element14, ComponentLink7URL=https://datasheet.ciiva.com/46430/1835847-46430150.pdf?src-supplier=Element14, ComponentLink8Description=https://datasheet.ciiva.com/144/mlccorderingcode-144650.pdf?src-supplier=Digi-Key, ComponentLink8URL=https://datasheet.ciiva.com/144/mlccorderingcode-144650.pdf?src-supplier=Digi-Key, ComponentLink9Description=https://datasheet.ciiva.com/144/mlccorderingcode-144649.pdf?src-supplier=Digi-Key, ComponentLink9URL=https://datasheet.ciiva.com/144/mlccorderingcode-144649.pdf?src-supplier=Digi-Key, ComponentLink10Description=https://datasheet.ciiva.com/5425/upy-gp-np0-16v-to-50v-8-5425564.pdf?src-supplier=Mouser, ComponentLink10URL=https://datasheet.ciiva.com/5425/upy-gp-np0-16v-to-50v-8-5425564.pdf?src-supplier=Mouser, ComponentLink11Description=https://datasheet.ciiva.com/8033/1734582-8033710.pdf?src-supplier=Element14, ComponentLink11URL=https://datasheet.ciiva.com/8033/1734582-8033710.pdf?src-supplier=Element14, ComponentLink12Description=https://datasheet.ciiva.com/8033/1734582-8033706.pdf?src-supplier=Element14, ComponentLink12URL=https://datasheet.ciiva.com/8033/1734582-8033706.pdf?src-supplier=Element14, Depth=0.8mm, Height=0.8mm, Lead Free="Lead Free", Length=1.6mm, Manufacturer Part Number=CC0603JRNPO9BN100, Mount="Surface Mount", Number of Pins=2, Packaging="Tape and Reel", Pricing 1="1=0.10000, 10=0.03900, 50=0.02120, 100=0.01740, 500=0.01240, 1000=0.00974 (USD)", Radiation Hardening=No, REACH SVHC="No SVHC", RoHS=Yes, RoHS Compliant=Yes, Series=CC, Stock 1=1700978, Supplier 1=Digi-Key, Termination=SMD/SMT, Thickness=0.035inch, Voltage Rating=50V, Voltage Rating (DC)=50V, Width=0.031inch
C37 C38: library part CC0603KRX5R8BB105, "CAP CER 1UF 25V X5R 0603", Case Code (Imperial)=0603, Case Code (Metric)=1608, Dielectric=X5R, LCSC Part Number=C14664, MANUFACTURER=Yageo, Max Operating Temperature=85°C, Min Operating Temperature=-55°C, Package Quantity=1, Supplier Part Number 1=311-1445-1-ND, Tolerance=10%, Voltage Rating=25V, Capacitance=1uF, Case/Package=0603, Category="Ceramic Capacitors", ComponentLink1Description=https://datasheet.ciiva.com/176/mlccorderingcode-176785.pdf?src-supplier=Digi-Key, ComponentLink1URL=https://datasheet.ciiva.com/176/mlccorderingcode-176785.pdf?src-supplier=Digi-Key, ComponentLink2Description=https://datasheet.ciiva.com/176/mlccorderingcode-176786.pdf?src-supplier=Digi-Key, ComponentLink2URL=https://datasheet.ciiva.com/176/mlccorderingcode-176786.pdf?src-supplier=Digi-Key, ComponentLink3Description=https://datasheet.ciiva.com/176/mlccorderingcode-176787.pdf?src-supplier=Digi-Key, ComponentLink3URL=https://datasheet.ciiva.com/176/mlccorderingcode-176787.pdf?src-supplier=Digi-Key, ComponentLink4Description=https://datasheet.ciiva.com/17436/upy-gphc-x5r-4v-to-50v-12-17436952.pdf?src-supplier=Avnet+Europe, ComponentLink4URL=https://datasheet.ciiva.com/17436/upy-gphc-x5r-4v-to-50v-12-17436952.pdf?src-supplier=Avnet+Europe, ComponentLink5Description=https://datasheet.ciiva.com/7978/1525783-7978171.pdf?src-supplier=Element14, ComponentLink5URL=https://datasheet.ciiva.com/7978/1525783-7978171.pdf?src-supplier=Element14, ComponentLink6Description=https://datasheet.ciiva.com/11586/upy-gphc-x5r-4v-to-50v-12-11586318.pdf?src-supplier=Avnet, ComponentLink6URL=https://datasheet.ciiva.com/11586/upy-gphc-x5r-4v-to-50v-12-11586318.pdf?src-supplier=Avnet, Construction=Flat, Depth=0.8mm, Halogen Free="Halogen Free", Height=0.8mm, Item Type=Capacitor, Lead Free="Lead Free", Length=1.6mm, Manufacturer Part Number=CC0603KRX5R8BB105, Mount="Surface Mount", Number of Pins=2, Packaging="Tape and Reel", Pricing 1="1=0.12000, 10=0.08400, 50=0.04760, 100=0.03940, 500=0.02764, 1000=0.02288 (USD)", Radiation Hardening=No, REACH SVHC="No SVHC", RoHS=Yes, RoHS Compliant=Yes, Series=CC, Stock 1=919939, Supplier 1=Digi-Key, Termination=SMD/SMT, Thickness=0.035inch, Voltage Rating (DC)=25V, Width=0.031inch
D1: library part 1N4148WS, "75V 200mW Single 1.25V@150mA 4ns 150mA SOD-323 Switching Diode ROHS", LCSC Part Number=C181133, MANUFACTURER="Guangdong Hottech", Package=SOD-323, Item Type=Diode, Manufacturer Part Number=1N4148WS
D2 D3 D4 D5 D6 D7: "75V 200mW Single 1.25V@150mA 4ns 150mA SOD-323 Switching Diode ROHS", LCSC Part Number=C181133, MANUFACTURER="Guangdong Hottech", Package=SOD-323, Item Type=Diode, Manufacturer Part Number=1N4148WS
J1: "CONN FFC BOTTOM 30POS 0.5MM R/A", Contact Voltage Rating (AC)=50V, LCSC Part Number=C506793, MANUFACTURER=Hirose, Supplier Part Number=6825061, Category="FFC / FPC", ComponentLink1Description=https://datasheet.ciiva.com/11745/0900766b80d985fc-11745247.pdf?src-supplier=Rs, ComponentLink1URL=https://datasheet.ciiva.com/11745/0900766b80d985fc-11745247.pdf?src-supplier=Rs, ComponentLink2Description=https://datasheet.ciiva.com/15176/getdatasheetpartid-439676-15176854.pdf?src-supplier=Verical, ComponentLink2URL=https://datasheet.ciiva.com/15176/getdatasheetpartid-439676-15176854.pdf?src-supplier=Verical, ComponentLink3Description=https://datasheet.ciiva.com/22630/58803-22630360.pdf?src-supplier=Farnell, ComponentLink3URL=https://datasheet.ciiva.com/22630/58803-22630360.pdf?src-supplier=Farnell, ComponentLink4Description=https://datasheet.ciiva.com/7661/58803-7661387.pdf?src-supplier=Element14, ComponentLink4URL=https://datasheet.ciiva.com/7661/58803-7661387.pdf?src-supplier=Element14, Connector Type=4640ConnectorType, Contact Pitch=500um, Item Type="FFC/FPC Connector", Manufacturer Part Number=FH12-30S-0.5SH(55), Pricing="2000=1.38 (USD)", RoHS=Yes, Stock=2000, Supplier="Future Electronics"
J2: "CONN 0.635MM HDR 30POS SMD", MANUFACTURER=Samtec, Supplier Part Number=2502799, Category=Connectors, ComponentLink1Description=http://suddendocs.samtec.com/catalog_english/adm6.pdf?src-supplier=Digi-Key, ComponentLink1URL=http://suddendocs.samtec.com/catalog_english/adm6.pdf?src-supplier=Digi-Key, ComponentLink2Description=https://datasheet.octopart.com/ADM6-30-01.5-L-4-2-A-TR-Samtec-datasheet-156965346.pdf?src-supplier=Sager+Electronics, ComponentLink2URL=https://datasheet.octopart.com/ADM6-30-01.5-L-4-2-A-TR-Samtec-datasheet-156965346.pdf?src-supplier=Sager+Electronics, ComponentLink3Description=https://datasheet.octopart.com/ADM6-30-01.5-L-4-2-A-TR-Samtec-datasheet-154586211.pdf?src-supplier=Toby+Electronics, ComponentLink3URL=https://datasheet.octopart.com/ADM6-30-01.5-L-4-2-A-TR-Samtec-datasheet-154586211.pdf?src-supplier=Toby+Electronics, ComponentLink4Description=https://datasheet.octopart.com/ADM6-30-01.5-L-4-2-A-TR-Samtec-datasheet-142027009.pdf?src-supplier=Master+Electronics, ComponentLink4URL=https://datasheet.octopart.com/ADM6-30-01.5-L-4-2-A-TR-Samtec-datasheet-142027009.pdf?src-supplier=Master+Electronics, Item Type=Connector, Manufacturer Part Number=ADM6-30-01.5-L-4-2-A-TR, Pricing="1=20.84 (GBP)", RoHS=No, Stock=10, Supplier=Rs
J3: "CONN HDR 60POS SMD GOLD", MANUFACTURER=Samtec, Supplier Part Number=1802786, Category=Connectors, ComponentLink1Description=https://datasheet.ciiva.com/9698/qth-9698170.pdf?src-supplier=Avnet, ComponentLink1URL=https://datasheet.ciiva.com/9698/qth-9698170.pdf?src-supplier=Avnet, ComponentLink2Description=https://datasheet.ciiva.com/400/qth-xxx-xx-x-d-xxx-mkt-400842.pdf?src-supplier=Digikey, ComponentLink2URL=https://datasheet.ciiva.com/400/qth-xxx-xx-x-d-xxx-mkt-400842.pdf?src-supplier=Digikey, Manufacturer Part Number=QTH-030-01-L-D-A-K-TR, Pricing="1=9.4, 25=8.99, 100=7.57, 250=6.25, 500=6.09 (GBP)", RoHS=Yes, Stock=69, Supplier=Rs
J4 J5 J6 J7: "Spacer Material: Steel Mounting: SMT Series: WA-SMSI Thread D: M2.5", MANUFACTURER="Wurth Electronics", Max Operating Temperature=150°C, Min Operating Temperature=-55°C, Supplier Part Number=732-7095-1-ND, Category="Spacers, Standoffs", ComponentLink1Description=http://www.farnell.com/datasheets/1960373.pdf?src-supplier=Farnell, ComponentLink1URL=http://www.farnell.com/datasheets/1960373.pdf?src-supplier=Farnell, ComponentLink2Description=http://www.mouser.com/ds/2/445/9774050151R-611428.pdf?src-supplier=Mouser, ComponentLink2URL=http://www.mouser.com/ds/2/445/9774050151R-611428.pdf?src-supplier=Mouser, ComponentLink3Description=https://media.digikey.com/pdf/Data%20Sheets/Wurth%20Electronics%20PDFs/WA-SMSx_Performance_Flyer.pdf?src-supplier=Digikey, ComponentLink3URL=https://media.digikey.com/pdf/Data%20Sheets/Wurth%20Electronics%20PDFs/WA-SMSx_Performance_Flyer.pdf?src-supplier=Digikey, ComponentLink4Description=http://www.farnell.com/datasheets/1960373.pdf?src-supplier=Element14, ComponentLink4URL=http://www.farnell.com/datasheets/1960373.pdf?src-supplier=Element14, ComponentLink5Description=https://datasheet.octopart.com/9774050151R-W%C3%BCrth-Elektronik-datasheet-48588545.pdf?src-supplier=Element14, ComponentLink5URL=https://datasheet.octopart.com/9774050151R-W%C3%BCrth-Elektronik-datasheet-48588545.pdf?src-supplier=Element14, ComponentLink6Description=http://www.farnell.com/datasheets/1960373.pdf?src-supplier=Newark, ComponentLink6URL=http://www.farnell.com/datasheets/1960373.pdf?src-supplier=Newark, ComponentLink7Description=https://katalog.we-online.de/em/datasheet/9774050151R.pdf?src-supplier=Digikey, ComponentLink7URL=https://katalog.we-online.de/em/datasheet/9774050151R.pdf?src-supplier=Digikey, Height=5.1mm, Item Type=Spacer, Length=0.252inch, Manufacturer Part Number=9774050151R, Material=Steel, Outside Diameter=0.201inch, Packaging=10Packaging, Plating=Tin, Pricing="1=1.16, 10=1.098, 50=0.979, 100=0.895 (USD)", Reach SVHC Compliant=Unknown, RoHS=Yes, Series=WA-SMSI, Stock=39400, Supplier=Digikey, Threaded/Unthreaded=Threaded
L1: library part HA72L-06301R5LFTR, "Power Inductors - SMD 1.5uH +/-20% @0A AEC-Q200", MANUFACTURER="TT BI", Supplier Part Number=2932065, Category="Fixed Inductors", Manufacturer Part Number=HA72L-06301R5LFTR, RoHS=No, Supplier=Farnell
L2: library part VLS3012HBX-3R3M, "FIXED IND 3.3UH 2.63A 150MOHM SM", Case/Package=Nonstandard, Current Rating=2.63A, DC Resistance (DCR)=150mR, MANUFACTURER=TDK, Max Operating Temperature=105°C, Min Operating Temperature=-40°C, Saturation Current=2.82A, Supplier Part Number=445-175070-1-ND, Test Frequency=1MHz, Tolerance=20%, Category="Fixed Inductors", ComponentLink1Description=http://www.farnell.com/datasheets/2724074.pdf?src-supplier=Farnell, ComponentLink1URL=http://www.farnell.com/datasheets/2724074.pdf?src-supplier=Farnell, ComponentLink2Description=https://product.tdk.com/info/en/catalog/datasheets/inductor_commercial_power_vls3012hbx_en.pdf?src-supplier=Digi-Key, ComponentLink2URL=https://product.tdk.com/info/en/catalog/datasheets/inductor_commercial_power_vls3012hbx_en.pdf?src-supplier=Digi-Key, ComponentLink3Description=https://product.tdk.com/info/en/catalog/datasheets/inductor_commercial_power_vls3012hbx_en.pdf?ref_disty=digikey&src-supplier=Digi-Key, ComponentLink3URL=https://product.tdk.com/info/en/catalog/datasheets/inductor_commercial_power_vls3012hbx_en.pdf?ref_disty=digikey&src-supplier=Digi-Key, ComponentLink4Description=http://www.farnell.com/datasheets/2724074.pdf?src-supplier=Newark, ComponentLink4URL=http://www.farnell.com/datasheets/2724074.pdf?src-supplier=Newark, Core Material=Metal, Manufacturer Part Number=VLS3012HBX-3R3M, Mounting Technology="Surface Mount", Packaging="Cut Tape", Pricing="1=0.6, 10=0.512, 25=0.4692, 50=0.4264, 100=0.3795, 250=0.3582, 500=0.30702, 1000=0.27291 (USD)", RoHS=Yes, RoHS Compliant=Yes, Series=VLS-HBX, Shielding=Shielded, Stock=9595, Supplier=Digi-Key
LED1 LED2 LED3: library part NCD0603G2, "Emerald 0603 Light Emitting Diodes (LED) ROHS", LCSC Part Number=C87326, MANUFACTURER="Foshan NationStar Optoelectronics", Package=0603, ComponentLink1Description=LCSC, ComponentLink1URL=https://www.lcsc.com/product-detail/Light-Emitting-Diodes-LED_Foshan-NationStar-Optoelectronics-NCD0603G2_C87326.html, Item Type=LED, Manufacturer Part Number=NCD0603G2
LED4: library part NCD0603R3, "RED LED 0603 Light Emitting Diodes", LCSC Part Number=C3151730, MANUFACTURER="Foshan NationStar Optoelectronics", Package=0603, ComponentLink1Description=LCSC, ComponentLink1URL=https://www.lcsc.com/product-detail/Light-Emitting-Diodes-LED_Foshan-NationStar-Optoelectronics-NCD0603R3_C3151730.html, Item Type=LED, Manufacturer Part Number=NCD0603R3
P1 P2 P3 P4 P5 P6 P7 P8 P9 P10 P11 P12 P13 P14 P15 P16 P17 P18 P19 P20 P21 P22 P24 P25 P26 P27 P28 P29 P30 P31 P32 P33 P34 P35 P36 P37 P38 P39: "Test Point ON", Item Type="TEST POINT", Manufacturer Part Number="TEST POINT"
Q1 Q2: "null 3A 400mW 112mΩ@4.5V,2.8A 1V@250uA P Channel SOT-23 MOSFETs ROHS", LCSC Part Number=C5290223, MANUFACTURER=FUXINSEMI, Package=MOSFET, ComponentLink1Description=LCSC, ComponentLink1URL=https://www.lcsc.com/product-detail/MOSFETs_FUXINSEMI-SI2301CDS_C5290223.html, Item Type=SOT-23, Manufacturer Part Number=SI2301CDS
Q3 Q4: "MOSFET N-CH 60V 300MA TO236AB", MANUFACTURER="Nexperia USA", Category=Uncategorized, ComponentLink1Description=http://www.farnell.com/datasheets/1499179.pdf?src-supplier=Farnell, ComponentLink1URL=http://www.farnell.com/datasheets/1499179.pdf?src-supplier=Farnell, ComponentLink2Description=https://assets.nexperia.com/documents/data-sheet/2N7002.pdf?src-supplier=Digi-Key, ComponentLink2URL=https://assets.nexperia.com/documents/data-sheet/2N7002.pdf?src-supplier=Digi-Key, ComponentLink3Description=http://www.farnell.com/datasheets/1499179.pdf?src-supplier=Newark, ComponentLink3URL=http://www.farnell.com/datasheets/1499179.pdf?src-supplier=Newark, Manufacturer Part Number=2N7002,215, RoHS=No, Supplier="Arrow Electronics", Supplier Part Number=2N7002,215
R1 R4 R16 R17 R23: library part RT0603DRD07200RL, "RES SMD 200 OHM 0.5% 1/10W 0603", Case/Package=0603, LCSC Part Number=C700498, MANUFACTURER=Yageo, Power Rating=100mW, Supplier Part Number 1=311-200DCT-ND, Tolerance=0.5%, Voltage Rating (DC)=50V, Lead Free="Lead Free", Manufacturer Part Number=RT0603DRD07200RL, Packaging="Cut Tape", Pricing 1="1=0.21, 10=0.174, 100=0.0682, 1000=0.02855, 2500=0.02617 (USD)", Resistance=200R, Stock 1=19572, Supplier 1=Digi-Key
R2 R7 R8 R14 R15: library part RC0603JR-07100KL, "RES 100K OHM 5% 1/10W 0603", Case Code (Imperial)=0603, Case Code (Metric)=1608, LCSC Part Number=C100048, MANUFACTURER=Yageo, Max Operating Temperature=155°C, Max Power Dissipation=100mW, Min Operating Temperature=-55°C, Resistance=100kR, Resistance Tolerance=5%, Resistor Type="Thick Film", Supplier Part Number 1=311-100KGRCT-ND, Temperature Coefficient=100ppm/°C, Voltage Rating=50V, Case/Package=0603, Category="Chip SMD Resistors", ComponentLink1Description=https://datasheet.ciiva.com/7746/443971-7746424.pdf?src-supplier=Element14, ComponentLink1URL=https://datasheet.ciiva.com/7746/443971-7746424.pdf?src-supplier=Element14, ComponentLink2Description=https://datasheet.ciiva.com/7983/443971-7983686.pdf?src-supplier=Element14, ComponentLink2URL=https://datasheet.ciiva.com/7983/443971-7983686.pdf?src-supplier=Element14, ComponentLink3Description=https://datasheet.ciiva.com/7746/443971-7746423.pdf?src-supplier=Element14, ComponentLink3URL=https://datasheet.ciiva.com/7746/443971-7746423.pdf?src-supplier=Element14, ComponentLink4Description=https://datasheet.ciiva.com/8887/pyu-rc0603-51-rohs-l-4-8887903.pdf?src-supplier=Avnet, ComponentLink4URL=https://datasheet.ciiva.com/8887/pyu-rc0603-51-rohs-l-4-8887903.pdf?src-supplier=Avnet, Contact Plating=Tin,Matte, Features="Moisture Resistant", Item Type=Resistor, Lead Free="Lead Free", Manufacturer Part Number=RC0603JR-07100KL, Number of Pins=2, Number of Terminations=2, Packaging="Tape and Reel", Power Rating=100mW, Pricing 1="1=0.10000, 10=0.02000, 100=0.00800, 1000=0.00360, 2500=0.00312 (USD)", Radiation Hardening=No, REACH SVHC="No SVHC", RoHS=Yes, RoHS Compliant=Yes, Series=RC, Size Code=0603, Stock 1=1210037, Supplier 1=Digi-Key, Termination=SMD/SMT, Tolerance=5%, Voltage Rating (DC)=50V, Width=0.8mm
R3: library part RC0603FR-0733K2L, "RES 33.2K OHM 1% 1/10W 0603", Case Code (Imperial)=0603, Case Code (Metric)=1608, LCSC Part Number=C185338, MANUFACTURER=Yageo, Max Operating Temperature=155°C, Max Power Dissipation=100mW, Min Operating Temperature=-55°C, Resistance=33.2kR, Resistor Type="Thick Film", Supplier Part Number 1=311-33.2KHRCT-ND, Temperature Coefficient=100ppm/°C, Tolerance=1%, Voltage Rating=50V, Case/Package=0603, Category="Chip SMD Resistors", ComponentLink1Description=https://datasheet.ciiva.com/11808/0900766b80f96399-11808316.pdf?src-supplier=RSComponents, ComponentLink1URL=https://datasheet.ciiva.com/11808/0900766b80f96399-11808316.pdf?src-supplier=RSComponents, Construction=Rectangular, Depth=0.8mm, Features="Moisture Resistant", Height=0.45mm, Lead Free="Lead Free", Length=1.6mm, Manufacturer Part Number=RC0603FR-0733K2L, Military Standard=Not, Mount="Surface Mount", Number of Terminations=2, Packaging="Tape and Reel", Power Rating=100mW, Pricing 1="1=0.10000, 10=0.02300, 100=0.00930, 1000=0.00417, 2500=0.00362 (USD)", RoHS=Yes, RoHS Compliant=Yes, Series=RC, Size Code=0603, Stock 1=1293262, Supplier 1=Digi-Key, Technology="THICK FILM", Termination=SMD/SMT, Voltage Rating (DC)=50V
R5 R6 R21: library part RT0603BRD0710KL, "RES SMD 10K OHM 0.1% 1/10W 0603", Case/Package=0603, LCSC Part Number=C95204, MANUFACTURER=Yageo, Max Operating Temperature=155°C, Min Operating Temperature=-55°C, Package Height=0.45mm, Package Length=1.6mm, Package Style=SMTMeter, Package Width=0.8mm, Power=100mW, Rated Temperature=70°C, Resistor Type="FIXED RESISTOR", Supplier Part Number 1=1991391P, Temperature Coefficient=25ppm/°C, Tolerance=0.1%, Working Voltage=75V, Category="Chip SMD Resistors", ComponentLink1Description=https://datasheet.ciiva.com:443/pdfs/VipMasterIC/IC/YAGO/YAGO-S-A0008510989/YAGO-S-A0008510989-1.pdf?src-supplier=IHS+Markit, ComponentLink1URL=https://datasheet.ciiva.com:443/pdfs/VipMasterIC/IC/YAGO/YAGO-S-A0008510989/YAGO-S-A0008510989-1.pdf?src-supplier=IHS+Markit, ComponentLink2Description=https://datasheet.ciiva.com/5624/pyu-rt-1-to-0-05-rohs-l-4-5624351.pdf?src-supplier=Mouser, ComponentLink2URL=https://datasheet.ciiva.com/5624/pyu-rt-1-to-0-05-rohs-l-4-5624351.pdf?src-supplier=Mouser, ComponentLink3Description=https://datasheet.ciiva.com/29721/pyu-rt-1-to-0-05-rohs-l-4-29721177.pdf?src-supplier=Digi-Key, ComponentLink3URL=https://datasheet.ciiva.com/29721/pyu-rt-1-to-0-05-rohs-l-4-29721177.pdf?src-supplier=Digi-Key, Construction=Chip, Item Type=Resistor, Manufacturer Part Number=RT0603BRD0710KL, Mounting Technology="Surface Mount", Packaging="Tape and Reel", Pins=2, Pricing 1="100=0.29800, 250=0.27800, 500=0.25900, 1000=0.23700 (GBP)", Reach SVHC Compliant=Yes, RoHS=Yes, RoHS Compliant=Yes, Stock 1=20510, Supplier 1=Rs, Technology="THIN FILM", Termination=Wraparound